# Altium PCB ResearchProject_V3_PCB.PcbDoc (part 2 of 2)
Units mil, origin at the board's own origin, x right, y up, seen from the top; angles counter-clockwise.
Board outline 6000 x 4000 mil, 4 copper layers (Top Layer, GND, 3V3, Bottom Layer), stack 23.756 mil thick; 138 components, 184 nets, 719 pads, 107 vias.
Unrouted connection lines stored in the file: 106.
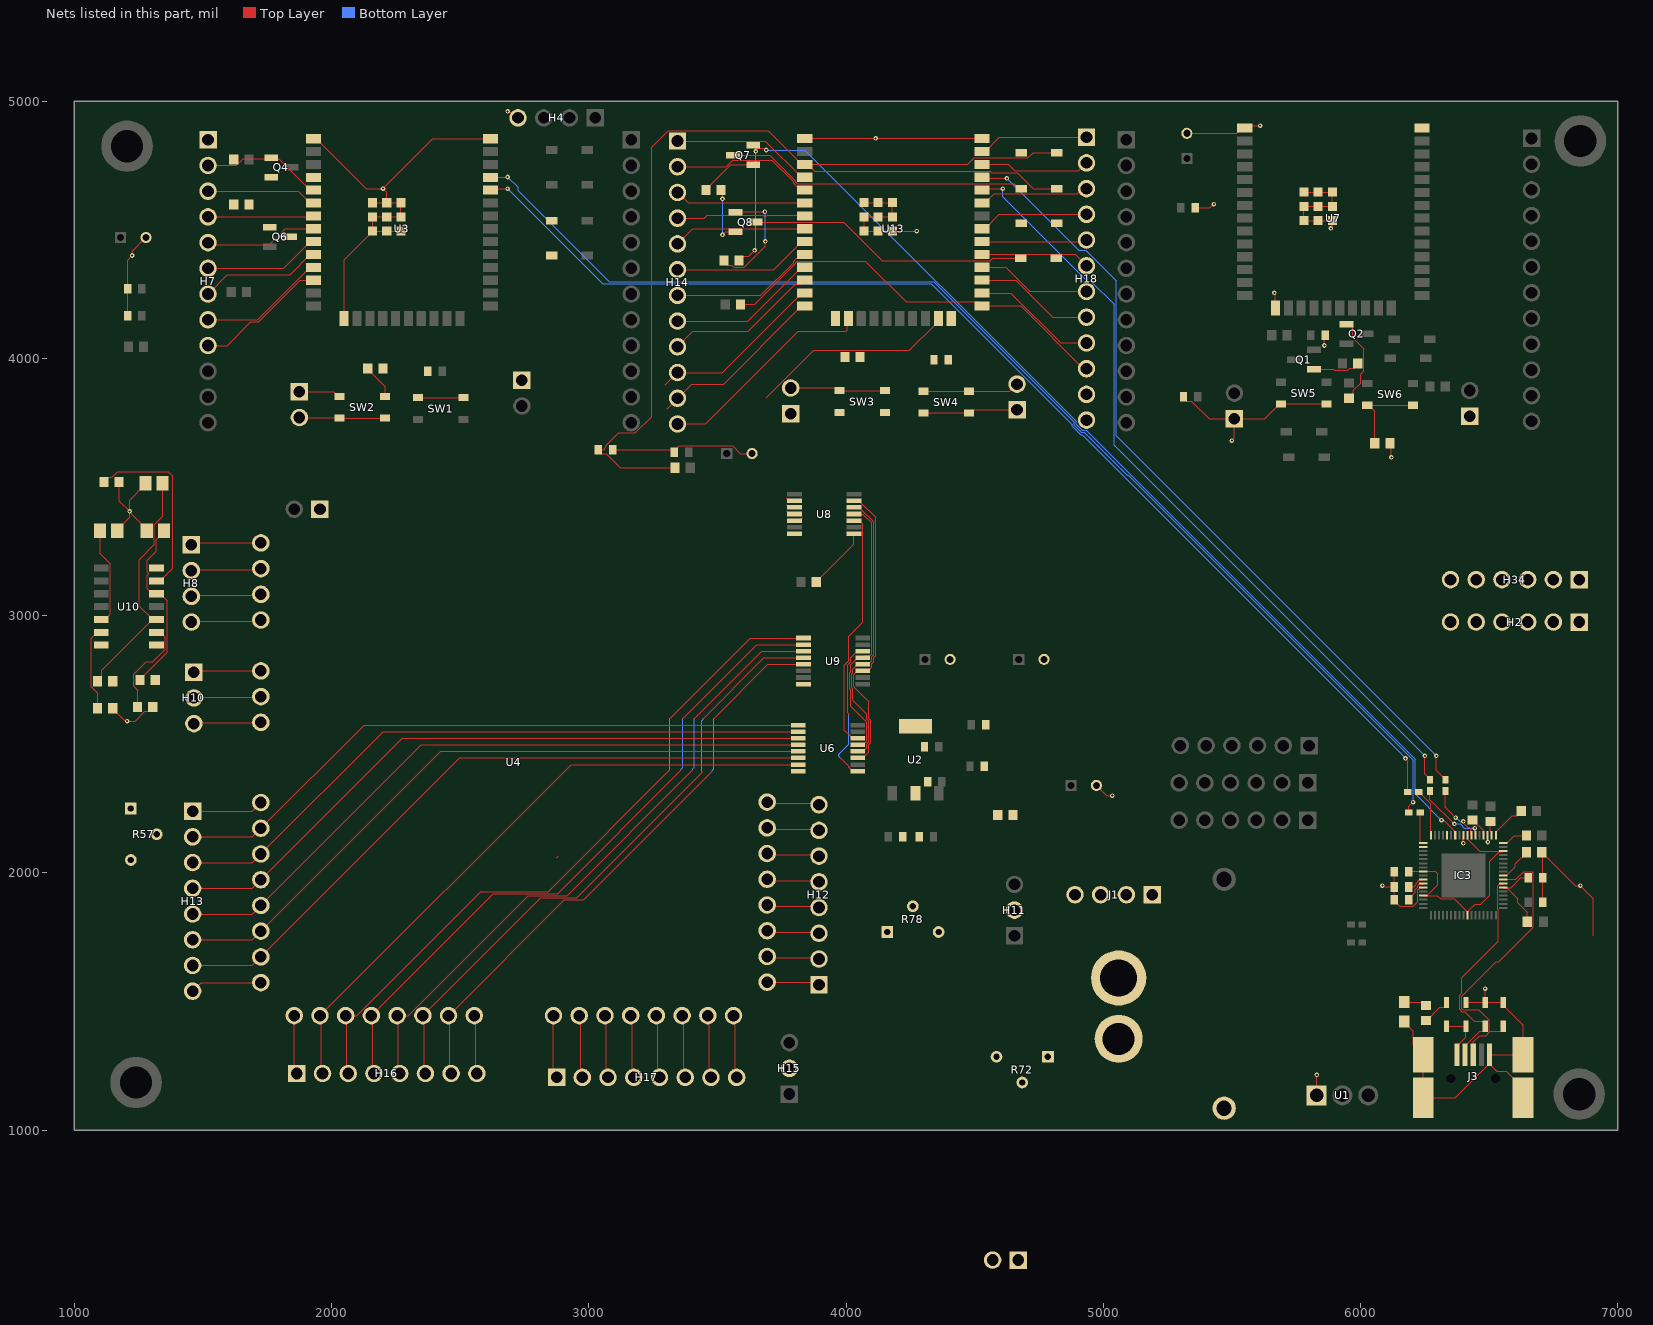
[diagram p4: the nets of this part, all layers, seen from the top]

## Via types
v1: diameter 17.72, hole 7.87, Top Layer to GND, 55 vias
v2: diameter 17.72, hole 7.87, GND to Bottom Layer, 34 vias
v3: diameter 17.72, hole 7.87, Top Layer to 3V3, 18 vias

## Nets (pads, with @x,y where several pads share a name; then routed paths per layer and width w, separated by ;. In a path a pad name is that pad's centre, name@x,y a point inside that pad or via, vN(x,y) a via of type N, cw(c..) or ccw(c..) an arc to the next point about the centre after c; other vN are vias at no path point) (continued)
CLIENT_GPIO25: H7.7 U3.10 | length 473.2
  Top Layer w4: H7.7@1520,4250 1595.17,4325.17 1838.98,4325.17 1917.64,4403.82 U3.10@1929.45,4403.82
CLIENT_GPIO26: H7.8 U3.11 | length 493.9
  Top Layer w4: H7.8@1520,4150 1713.82,4150 1917.64,4353.82 U3.11@1929.45,4353.82
CLIENT_GPIO27: H7.9 U3.12 | length 514.6
  Top Layer w4: H7.9@1520,4050 1594.59,4050 1686.59,4142 1717.13,4142 1878.95,4303.82 U3.12@1929.45,4303.82
CLIENT_GPIO32: H7.5 U3.8 | length 439
  Top Layer w4: H7.5@1520,4450 1528.8,4441.2 1758.43,4441.2 1821.04,4503.82 U3.8@1929.45,4503.82
CLIENT_GPIO33: H7.6 U3.9 | length 452.5
  Top Layer w4: H7.6@1520,4350 1813.82,4350 1917.64,4453.82 U3.9@1929.45,4453.82
CLIENT_GPIO34: H7.3 U3.6 | length 428.6
  Top Layer w4: H7.3@1520,4650 1871.46,4650 1917.64,4603.82 U3.6@1929.45,4603.82
CLIENT_GPIO35: H7.4 U3.7 | length 411
  Top Layer w4: H7.4@1520,4550 1925.63,4550 U3.7@1929.45,4553.82
CLIENT_GPIO36: H7.1 U3.4
CLIENT_GPIO39: H7.2 U3.5 | length 471.3
  Top Layer w4: H7.2@1520,4750 1629.57,4750 1656.16,4776.59 1794.87,4776.59 1917.64,4653.82 U3.5@1929.45,4653.82
CLIENT_IO0_AUTO: D17.1 Q6.3
CLIENT_IO0_KEY: D16.1 H20.2 SW2.3 SW2.4 | length 334.5
  Top Layer w4: H20.2@1875,3770 2029.09,3770 SW2.3@2031.42,3767.68 SW2.4@2208.58,3767.68
CLIENT_RTS: IC3.19 Q4.2 R51.1
CLIENT_RXD: IC3.18 R19.1 | length 130.7
  Top Layer w4: R19.1@6231.65,2235 6231.65,2117.92 6233.59,2115.98 IC3.18@6244.49,2115.98
CLIENT_TXD: IC3.17 R18.1 | length 190.8
  Top Layer w4: R18.1@6226.65,2315 6229.61,2315 6239.42,2305.19 6239.42,2302.24 6274.02,2267.64 IC3.17@6274.02,2145.51
CLIENT_U0RXD: R18.2 U3.34 | length 4614.3
  Top Layer w4: U3.34@2618.43,4653.82 2624.61,4660 v2(2685,4660) ; v2(6175,2445) 6175,2441.29 6183.35,2432.94 R18.2@6183.35,2315
  Bottom Layer w4: v2(2685,4660) 3055.04,4289.96 4331.55,4289.96 4879.04,3742.46 4879.04,3736.82 4911.82,3704.04 4917.46,3704.04 6175,2446.51 v2(6175,2445)
  other v1: 6175,2445 2685,4660
CLIENT_U0TXD: R19.2 U3.35 | length 4749.6
  Top Layer w4: U3.35@2618.43,4703.82 2619.61,4705 v1(2685,4705) ; R19.2@6188.35,2235 6188.35,2258.35 v1(6205,2275)
  Bottom Layer w4: v1(2685,4705) 2725.53,4664.47 2725.53,4652.05 3079.62,4297.96 4340.54,4297.96 4887.04,3751.45 4887.04,3740.14 4915.14,3712.04 4926.45,3712.04 5092.44,3546.05 5096.38,3546.05 6205,2437.43 v1(6205,2275)
  other v2: 6205,2275 2685,4705
GND: C1.2 C2.2 C3.2 C4.2 C5.2 C6.2 C7.2 C8.2 C9.2 C10.2 C11.2 C12.1 C16.2 C17.2 C25.2 C32.2 C35.1 C37.2 C38.2 C39.2 C43.2 C45.1 C46.2 C49.2 C50.2 C51.2 C52.2 C59.2 C60.2 D8.1 D9.1 D10.1 D13.1 H2.1 H2.2 H2.3 H2.4 H2.5 H2.6 H4.4 H6.1 H19.1 H21.1 H22.1 H34.1 H34.2 H34.3 H34.4 H34.5 H34.6 IC3.3 IC3.9 IC3.29 J1.3 J1.4 J2.2 J3.5 J3.6 J3.7 J3.8 J3.9 R5.2 R38.2 R50.2 R56.1 R65.2 R70.1 R77.1 SW1.1 SW1.2 SW3.1 SW3.2 SW5.1 SW5.2 U1.1 U2.2 U2.4 U3.1 U3.15 U3.38 U3.39 U3.40 U3.41 U3.42 U3.43 U3.44 U3.45 U3.46 U3.47 U4.1 U6.8 U7.1 U7.15 U7.38 U7.39 U7.40 U7.41 U7.42 U7.43 U7.44 U7.45 U7.46 U7.47 U8.7 U9.8 U13.1 U13.15 U13.38 U13.39 U13.40 U13.41 U13.42 U13.43 U13.44 U13.45 U13.46 U13.47 | length 9108.3
  Top Layer w4: R56.1@1149.53,2640 1149.53,2638.03 1194.93,2592.62 1202.38,2592.62 v1(1205,2590) 1236.83,2590 1274.15,2627.31 1289.28,2627.31 1305,2643.03 R70.1@1305,2645 ; C43.2@1166.93,3330 1166.93,3334.92 1215,3382.99 1215,3401.46 1281.54,3334.92 C49.2@1281.54,3330 ; R77.1@1174.53,3520 1174.53,3445.47 v1(1215,3405) 1215,3448.54 1276.54,3510.08 C46.2@1276.54,3515 ; C16.2@1207.05,4165 C9.2@1207.05,4270 1207.05,4382.05 v1(1225,4400) 1225,4416.57 C8.2@1278.43,4470 ; U3.1@1929.45,4853.82 1941.26,4853.82 2135.08,4660 v1(2200,4660) ; U3.15@2048.94,4154.61 2048.94,4383.94 U3.41@2159.76,4494.76 ; U3.39@2159.76,4605 U3.46@2214.88,4605 ; U3.43@2270,4494.76 U3.42@2214.88,4494.76 U3.41@2159.76,4494.76 ; SW1.1@2336.42,3847.32 SW1.2@2513.58,3847.32 ; U3.38@2618.43,4853.82 2393.82,4853.82 v1(2200,4660) ; v1(2685,4960) 2688.71,4960 2713.71,4935 H4.4@2725,4935 ; C52.2@3092.95,3645 3322.05,3645 3328.5,3638.54 3331.46,3638.54 3352.42,3659.5 3558.86,3659.5 3588.37,3630 C50.2@3635,3630 ; U13.1@3839.68,4854.06 3840.63,4855 v1(4115,4855) 4527.72,4855 U13.38@4528.66,4854.06 ; U13.39@4070,4605.24 U13.46@4125.12,4605.24 U13.45@4180.24,4605.24 U13.44@4180.24,4550.12 U13.47@4125.12,4550.12 U13.40@4070,4550.12 U13.41@4070,4495 U13.42@4125.12,4495 U13.43@4180.24,4495 v1(4275,4495) ; C17.2@4973.43,2340 5013.43,2300 v1(5035,2300) ; C12.1@5312.05,3850 5312.05,3845.87 5324.42,3833.5 5343.1,3833.5 5411.59,3765 H6.1@5510,3765 ; C1.2@5325,4875 5518.19,4875 5538.19,4895 U7.1@5550,4895 5560,4905 v1(5610,4905) ; C11.2@5357.95,4585 5415,4585 v1(5430,4600) ; v1(5500,3680) 5500,3681.01 5510,3691.01 H6.1@5510,3765 ; v1(5665,4255) 5665,4251.29 5669.49,4246.8 U7.15@5669.49,4195.79 ; U7.39@5764.6,4661.9 U7.39@5780.31,4646.18 U7.46@5835.43,4646.18 U7.45@5890.55,4646.18 U7.44@5890.55,4591.06 U7.47@5835.43,4591.06 U7.40@5780.31,4591.06 U7.41@5780.31,4535.94 U7.42@5835.43,4535.94 U7.43@5890.55,4535.94 5890.55,4513.68 5885,4508.13 v1(5885,4505) ; U1.1@5829.61,1135 5830,1135.39 v1(5830,1215) ; v1(5860,4050) 5860,4087.05 C10.2@5862.95,4090 ; SW5.1@5868.58,3822.68 SW5.2@5691.42,3822.68 5685.51,3822.68 5627.83,3765 H6.1@5510,3765 ; v1(6085,1950) 6088.71,1950 6093.71,1945 C59.2@6132.05,1945 ; R5.2@6114.53,3670 6120,3664.53 v1(6120,3615) ; C38.2@6132.05,2005 C59.2@6132.05,1945 ; D13.1@6170,1422.6 6170,1419.65 6206.13,1383.51 6206.13,1330.87 J3.6@6244.49,1292.52 J3.7@6244.49,1125.2 6368.5,1125.2 J3.5@6501.38,1258.07 ; IC3.29@6244.49,1942.76 6231.69,1942.76 6225.88,1936.94 6225.27,1936.94 6221.76,1933.43 6221.76,1887.44 6204.81,1870.5 6152.42,1870.5 6132.05,1890.87 C60.2@6132.05,1895 C59.2@6132.05,1945 ; v1(6400,2115) IC3.9@6400,2145.51 ; D10.1@6410,1496.26 D9.1@6485,1496.26 ; v1(6485,1550) D9.1@6485,1496.26 ; IC3.3@6494.49,2145.51 6494.74,2145.26 6494.74,2120.26 v1(6495,2120) ; J3.9@6632.28,1125.2 6632.28,1163.58 6566.31,1229.56 6529.89,1229.56 J3.5@6501.38,1258.07 ; R38.2@6704.53,2078.03 6720.24,2062.31 6722.21,2062.31 6834.53,1950 v1(6855,1950) 6905,1900 6905,1755 ; R38.2@6704.53,2080 6707.95,2076.57 C25.2@6707.95,1980 C39.2@6707.95,1885 ; U3.41@2159.76,4494.76 U3.40@2159.76,4549.88 U3.47@2214.88,4549.88 U3.44@2270,4549.88 U3.45@2270,4605 U3.46@2214.88,4605 ; v1(2200,4660) 2214.88,4645.12 U3.46@2214.88,4605 ; D9.1@6485,1496.26 D8.1@6555,1496.26 6555,1484.45 6632.28,1407.17 J3.8@6632.28,1292.52 J3.5@6501.38,1292.52 J3.5@6501.38,1258.07
NetC25_1: C25.1 FB2.2 IC3.57 | length 291.1
  Top Layer w4: FB2.2@6648.5,1810 6648.5,1847.18 6611.62,1884.07 6611.62,1900.06 6570.86,1940.82 6557.45,1940.82 IC3.57@6555.51,1942.76 6585.37,1942.76 6622.61,1980 C25.1@6652.05,1980
NetC43_1: C43.1 R54.2 U10.5 | length 384.7
  Top Layer w4: C43.1@1100,3330 1100,3241.04 1139.78,3201.26 1139.78,3004.78 1120,2985 U10.5@1105,2985
NetC46_1: C46.1 R68.2 U10.10 | length 933.2
  Top Layer w4: R68.2@1090.47,2745 1106.19,2760.72 1106.19,2787.09 U10.10@1304.09,2985 ; U10.10@1319.09,2985 U10.10@1304.09,2985 ; C46.1@1343.46,3515 1343.46,3385.65 1311.16,3353.34 1311.16,3276.44 1251.76,3217.04 1251.76,3037.34 U10.10@1304.09,2985
NetC49_1: C49.1 R75.2 U10.12 | length 705.3
  Top Layer w4: R75.2@1255.47,2750 1255.47,2751.97 1361.87,2858.37 1361.87,3057.22 1334.09,3085 U10.12@1319.09,3085 1304.09,3085 1284.31,3104.78 1284.31,3156 1290.31,3162 1284.31,3168 1284.31,3214.83 1319.16,3249.67 1319.16,3295.77 1348.46,3325.08 C49.1@1348.46,3330
NetC59_1: C59.1 IC3.27 | length 72.5
  Top Layer w4: C59.1@6187.95,1945 6208.32,1945 6213.76,1950.43 6213.76,1952.49 6216.8,1955.53 6216.8,1959.97 6229.14,1972.32 6242.55,1972.32 IC3.27@6244.49,1974.25
NetC60_1: C60.1 IC3.28 | length 94.8
  Top Layer w4: C60.1@6187.95,1895 6187.95,1899.13 6213.76,1924.94 6213.76,1936.74 6221.76,1944.74 6221.76,1949.18 6229.14,1956.57 6242.55,1956.57 IC3.28@6244.49,1958.5
NetD6_2: D6.2 D10.2 J3.1 | length 200.6
  Top Layer w4: D6.2@6335,1403.74 D10.2@6410,1403.74 6410,1361.57 6375.39,1326.97 J3.1@6375.39,1292.52
NetD13_2: D13.2 R44.1 | length 90.3
  Top Layer w4: D13.2@6170,1497.4 6242.13,1497.4 R44.1@6255,1484.53
NetF1_1: F1.1 J1.1 J1.2 J2.1
NetH20_1: H20.1 R50.1 SW2.1 SW2.2 | length 299.4
  Top Layer w4: H20.1@1875,3870 2007.83,3870 2025.51,3852.32 SW2.1@2031.42,3852.32 ; R50.1@2140.94,3960 2140.94,3958.03 2208.58,3890.39 SW2.2@2208.58,3852.32
NetH21_2: H21.2 R48.1 U8.8 | length 248.8
  Top Layer w4: R48.1@3884.53,3130 3884.53,3131.97 4030.67,3278.11 U8.8@4030.67,3318.23
NetH23_1: H23.1 R65.1 SW4.1 SW4.2 | length 368.7
  Top Layer w4: SW4.2@4301.42,3787.68 SW4.1@4478.58,3787.68 4484.49,3787.68 4496.81,3800 H23.1@4665,3800
NetH24_1: H24.1 R5.1 SW6.1 SW6.2 | length 340.3
  Top Layer w4: R5.1@6055.47,3670 6055.47,3794.53 6032.32,3817.68 SW6.2@6026.42,3817.68 SW6.1@6203.58,3817.68
NetIC3_1: IC3.1 R42.2 | length 146.8
  Top Layer w4: IC3.1@6525.98,2145.51 6525.98,2158.31 6589.99,2222.31 6609.28,2222.31 6625,2238.03 R42.2@6625,2240
NetIC3_2: IC3.2 R40.2 | length 56.7
  Top Layer w4: R40.2@6505,2200 6505,2163.54 6510.24,2158.31 IC3.2@6510.24,2145.51
NetIC3_4: IC3.4 R33.1 | length 78.8
  Top Layer w4: R33.1@6435,2205 6436.97,2205 6476.8,2165.17 6476.8,2147.45 IC3.4@6478.74,2145.51
NetIC3_60: IC3.60 R38.1 | length 135.1
  Top Layer w4: IC3.60@6555.51,1990 6557.45,1991.94 6570.86,1991.94 6602.24,2023.32 6602.24,2034.8 6645.47,2078.03 R38.1@6645.47,2080
NetIC3_68: IC3.68 R45.1 | length 102
  Top Layer w4: IC3.68@6555.51,2115.98 6568.31,2115.98 6597.32,2145 R45.1@6645.47,2145
NetQ1_1: Q1.1 R2.2 | length 183.1
  Top Layer w4: Q1.1@5819.37,3957.2 5895.86,3957.2 5898.75,3954.31 5950.67,3954.31 5958.67,3962.31 5973.81,3962.31 5989.53,3978.03 R2.2@5989.53,3980
NetQ2_1: Q2.1 R3.2 | length 335.1
  Top Layer w4: R3.2@5955,3845 5956.97,3845 5972.69,3860.72 5972.69,3875.85 6000.73,3903.9 6000.73,3939.21 6013.24,3951.72 6013.24,4037.45 5970.2,4080.49 5970.2,4122 5962.26,4129.95 Q2.1@5958.51,4129.95
NetQ4_1: Q4.1 R47.2
NetQ6_1: Q6.1 R51.2
NetQ7_1: Q7.1 R59.2 | length 225.3
  Top Layer w4: R59.2@3455.47,4655 3455.47,4656.97 3471.19,4672.69 3473.16,4672.69 3552.68,4752.2 Q7.1@3639.37,4752.2
NetQ8_1: Q8.1 R69.2 | length 456.6
  Top Layer w4: R69.2@3525.47,4380 3525.47,4378.03 3541.19,4362.31 3556.33,4362.31 3564.33,4354.31 3604.73,4354.31 3686.57,4436.16 v1(3686.57,4455.2) ; Q8.1@3570.63,4567.8 3572.83,4570 v1(3685,4570)
  Bottom Layer w4: v1(3685,4570) 3685.79,4569.21 3685.79,4455.98 v1(3686.57,4455.2)
  other v2: 3686.57,4455.2 3685,4570
NetR56_2: R56.2 R57.1 U10.6 | length 329.5
  Top Layer w4: R56.2@1090.47,2640 1090.47,2699.11 1066.76,2722.83 1066.76,2911.76 1090,2935 U10.6@1105,2935
NetR70_2: R70.2 R72.1 U10.9 | length 384.6
  Top Layer w4: R70.2@1245.94,2645 1245.94,2710.33 1231.76,2724.52 1231.76,2772.17 1280.04,2820.45 1305.59,2820.45 1353.87,2868.74 1353.87,2915.22 1334.09,2935 U10.9@1319.09,2935
NetR77_2: R77.2 R78.1 U10.13 | length 734.1
  Top Layer w4: R77.2@1115.47,3520 1115.47,3521.97 1131.19,3537.69 1146.33,3537.69 1168.18,3559.54 1364.57,3559.54 1383.09,3541.03 1383.09,3183.99 1334.09,3135 U10.13@1319.09,3135
NetU6_9: U6.9 U9.14 | length 562
  Top Layer w4: 3975,2450 4010.61,2414.39 4010.61,2409.68 4018,2402.29 4038.3,2402.29 U6.9@4045.16,2395.43 ; 4010,2615 4010,2618.71 4006.77,2621.94 4006.77,2809.25 4018.61,2821.09 4018.61,2835.37 4034.29,2851.04 4034.9,2851.04 4045.63,2861.77 U9.14@4065.32,2861.77
  Bottom Layer w4: 3975,2450 3972.38,2452.62 3972.38,2457.62 3971.66,2458.34 3971.66,2461.66 4010,2500 4010,2615
PLC_A_1: H8.2 R57.2 R57.3 U4.4 U10.7 | length 273.3
  Top Layer w4: H8.2@1455,3175 1458.9,3178.9 1721.18,3178.9 U4.4@1725.08,3182.8
PLC_A_2: H8.3 R72.2 R72.3 U4.5 U10.8 | length 273.3
  Top Layer w4: H8.3@1455,3075 1458.9,3078.9 1721.18,3078.9 U4.5@1725.08,3082.8
PLC_A_3: H8.4 R78.2 R78.3 U4.6 U10.14 | length 273.3
  Top Layer w4: H8.4@1455,2975 1458.9,2978.9 1721.18,2978.9 U4.6@1725.08,2982.8
PLC_A_GND: H8.1 U4.3 | length 273.3
  Top Layer w4: H8.1@1455,3275 1462.8,3282.8 U4.3@1725.08,3282.8
PLC_A_RS_GND: H10.3 U4.9 | length 262.2
  Top Layer w4: H10.3@1465,2580 1467.58,2582.58 1722.5,2582.58 U4.9@1725.08,2585.16
PLC_A_RS_RX: H10.1 U4.7 | length 262.2
  Top Layer w4: H10.1@1465,2780 1470.16,2785.16 U4.7@1725.08,2785.16
PLC_A_RS_TX: H10.2 U4.8 | length 262.2
  Top Layer w4: H10.2@1465,2680 1467.58,2682.58 1722.5,2682.58 U4.8@1725.08,2685.16
PLC_B_1: H13.2 U4.11 U6.1 | length 2534.8
  Top Layer w4: H13.2@1460,2140 1691.73,2140 U4.11@1725.08,2173.35 2126.3,2574.57 U6.1@3814.84,2574.57
PLC_B_2: H13.3 U4.12 U6.2 | length 2565.7
  Top Layer w4: H13.3@1460,2040 1691.73,2040 U4.12@1725.08,2073.35 2200.71,2548.98 U6.2@3814.84,2548.98
PLC_B_3: H13.4 U4.13 U6.3 | length 2596.5
  Top Layer w4: H13.4@1460,1940 1691.73,1940 U4.13@1725.08,1973.35 2275.12,2523.39 U6.3@3814.84,2523.39
PLC_B_4: H13.5 U4.14 U6.4 | length 2627.3
  Top Layer w4: H13.5@1460,1840 1691.73,1840 U4.14@1725.08,1873.35 2349.53,2497.8 U6.4@3814.84,2497.8
PLC_B_5: H13.6 U4.15 U6.5 | length 2658.1
  Top Layer w4: H13.6@1460,1740 1691.73,1740 U4.15@1725.08,1773.35 2423.94,2472.2 U6.5@3814.84,2472.2
PLC_B_6: H13.7 U4.16 U6.6 | length 2689
  Top Layer w4: H13.7@1460,1640 1691.73,1640 U4.16@1725.08,1673.35 2498.35,2446.61 U6.6@3814.84,2446.61
PLC_B_GND: H13.1 U4.10 | length 278.9
  Top Layer w4: H13.1@1460,2240 1691.73,2240 U4.10@1725.08,2273.35
PLC_B_VI: H13.8 U4.17 | length 278.9
  Top Layer w4: H13.8@1460,1540 1493.35,1573.35 U4.17@1725.08,1573.35
PLC_C_1: H16.2 U4.19 U6.7 | length 2493.3
  Top Layer w4: H16.2@1965,1220 1960,1225 1960,1440 U4.19@1955,1445 2931.02,2421.02 U6.7@3814.84,2421.02
PLC_C_2: H16.3 U4.20 U9.1 | length 2734.3
  Top Layer w4: H16.3@2065,1220 2060,1225 2060,1440 U4.20@2055,1445 2098.49,1445 2580.8,1927.3 2842.3,1927.3 3315,2400 ; 3315,2600 3627.95,2912.95 U9.1@3835,2912.95
  Bottom Layer w4: 3315,2400 3315,2600
PLC_C_3: H16.4 U4.21 U9.2 | length 2620.8
  Top Layer w4: H16.4@2165,1220 2160,1225 2160,1440 U4.21@2155,1445 2629.3,1919.3 2879.3,1919.3 3360,2400 ; 3365,2600 3652.36,2887.36 U9.2@3835,2887.36
  Bottom Layer w4: 3360,2400 3360,2403.71 3365,2408.71 3365,2600
PLC_C_4: H16.5 U4.22 U9.3 | length 2510.2
  Top Layer w4: H16.5@2265,1220 2260,1225 2260,1440 U4.22@2255,1445 2298.49,1445 2764.8,1911.3 2916.3,1911.3 3405,2400 ; 3410,2600 3671.77,2861.77 U9.3@3835,2861.77
  Bottom Layer w4: 3405,2400 3405,2403.71 3410,2408.71 3410,2600
PLC_C_5: H16.6 U4.23 U9.4 | length 2406.2
  Top Layer w4: H16.6@2365,1220 2360,1225 2360,1440 U4.23@2355,1445 2813.3,1903.3 2953.3,1903.3 3440.84,2390.84 3440.84,2394.16 3440,2395 ; 3445,2600 3681.18,2836.18 U9.4@3835,2836.18
  Bottom Layer w4: 3440,2395 3440,2591.29 3445,2596.29 3445,2600
PLC_C_6: H16.7 U4.24 U9.5 | length 2291.9
  Top Layer w4: H16.7@2465,1220 2460,1225 2460,1440 U4.24@2455,1445 2905.3,1895.3 2980.3,1895.3 3480,2395 ; 3485,2600 3695.59,2810.59 U9.5@3835,2810.59
  Bottom Layer w4: 3480,2395 3480,2398.71 3485,2403.71 3485,2600
PLC_C_GND: H16.1 U4.18 | length 229.1
  Top Layer w4: U4.18@1855,1445 1855,1230 H16.1@1865,1220
PLC_C_VI2: H16.8 U4.25 | length 229.1
  Top Layer w4: U4.25@2555,1445 2560,1440 2560,1225 H16.8@2565,1220
PLC_D_1: H17.2 U4.27 | length 245
  Top Layer w4: U4.27@2962.87,1445 2968.94,1438.94 2968.94,1211.06 H17.2@2975,1205
PLC_D_2: H17.3 U4.28 | length 245
  Top Layer w4: U4.28@3062.87,1445 3068.94,1438.94 3068.94,1211.06 H17.3@3075,1205
PLC_D_3: H17.4 U4.29 | length 245
  Top Layer w4: U4.29@3162.87,1445 3168.94,1438.94 3168.94,1211.06 H17.4@3175,1205
PLC_D_4: H17.5 U4.30 | length 245
  Top Layer w4: U4.30@3262.87,1445 3268.94,1438.94 3268.94,1211.06 H17.5@3275,1205
PLC_D_5: H17.6 U4.31 | length 245
  Top Layer w4: U4.31@3362.87,1445 3368.94,1438.94 3368.94,1211.06 H17.6@3375,1205
PLC_D_6: H17.7 U4.32 | length 245
  Top Layer w4: U4.32@3462.87,1445 3468.94,1438.94 3468.94,1211.06 H17.7@3475,1205
PLC_D_GND: H17.1 U4.26 | length 245
  Top Layer w4: U4.26@2862.87,1445 2862.87,1217.13 H17.1@2875,1205
PLC_D_VO1: H15.2 H17.8 U4.33 | length 245
  Top Layer w4: U4.33@3562.87,1445 3568.94,1438.94 3568.94,1211.06 H17.8@3575,1205
PLC_DS: U6.14 U8.10 | length 945.1
  Top Layer w4: 2875.16,2058.39 2882.02,2065.24 ; U8.10@4030.67,3369.41 4050.85,3369.41 4061.58,3358.68 4062.19,3358.68 4065.7,3355.16 4065.7,2973.94 4010.61,2918.85 4010.61,2824.4 3994.14,2807.93 3994.14,2554.11 4018,2530.24 4038.3,2530.24 U6.14@4045.16,2523.39
PLC_E_1: H12.2 U4.35 | length 205.5
  Top Layer w4: U4.35@3693.58,1674.92 3698.54,1669.96 3890.04,1669.96 H12.2@3895,1665
PLC_E_2: H12.3 U4.36 | length 205.5
  Top Layer w4: U4.36@3693.58,1774.92 3698.54,1769.96 3890.04,1769.96 H12.3@3895,1765
PLC_E_3: H12.4 U4.37 | length 205.5
  Top Layer w4: U4.37@3693.58,1874.92 3698.54,1869.96 3890.04,1869.96 H12.4@3895,1865
PLC_E_4: H12.5 U4.38 | length 205.5
  Top Layer w4: U4.38@3693.58,1974.92 3698.54,1969.96 3890.04,1969.96 H12.5@3895,1965
PLC_E_5: H12.6 U4.39 | length 205.5
  Top Layer w4: U4.39@3693.58,2074.92 3698.54,2069.96 3890.04,2069.96 H12.6@3895,2065
PLC_E_6: H12.7 U4.40 | length 205.5
  Top Layer w4: U4.40@3693.58,2174.92 3698.54,2169.96 3890.04,2169.96 H12.7@3895,2165
PLC_E_GND: H12.1 U4.34 | length 205.5
  Top Layer w4: U4.34@3693.58,1574.92 3885.08,1574.92 H12.1@3895,1565
PLC_E_VO2: H11.2 H12.8 U4.41 | length 205.5
  Top Layer w4: U4.41@3693.58,2274.92 3698.54,2269.96 3890.04,2269.96 H12.8@3895,2265
PLC_OE: U6.13 U8.11 U9.13 | length 1058.5
  Top Layer w4: U8.11@4030.67,3395 4065.7,3395 4099.86,3360.85 4099.86,2850.43 4092.47,2843.04 4072.17,2843.04 U9.13@4065.32,2836.18 4045.63,2836.18 4034.9,2825.45 4034.29,2825.45 4018.61,2809.78 4018.61,2781.22 4014.77,2777.38 4014.77,2715.85 4018.61,2712.01 4018.61,2647 4079.7,2585.91 4079.7,2512.04 4072.31,2504.65 4052.02,2504.65 U6.13@4045.16,2497.8
PLC_SH_CP: U6.11 U8.13 U9.11 | length 1165.8
  Top Layer w4: U8.13@4030.67,3446.18 4050.85,3446.18 4061.58,3435.45 4062.19,3435.45 4115.86,3381.78 4115.86,2843.8 4107.86,2835.8 4107.86,2821.52 4099.86,2813.52 4099.86,2799.25 4092.47,2791.86 4072.17,2791.86 U9.11@4065.32,2785 4045.63,2785 4034.9,2774.27 4034.29,2774.27 4030.77,2770.75 4030.77,2722.48 4087.7,2665.55 4087.7,2600.54 4095.7,2592.54 4095.7,2505.41 4087.7,2497.41 4087.7,2468.86 4072.31,2453.47 4052.02,2453.47 U6.11@4045.16,2446.61
PLC_ST_CP: U6.12 U8.12 U9.12 | length 1108
  Top Layer w4: U8.12@4030.67,3420.59 4050.85,3420.59 4061.58,3409.86 4062.19,3409.86 4107.86,3364.19 4107.86,2847.11 4099.86,2839.11 4099.86,2824.84 4092.47,2817.45 4072.17,2817.45 U9.12@4065.32,2810.59 4045.63,2810.59 4034.9,2799.86 4034.29,2799.86 4026.61,2792.19 4026.61,2777.91 4022.77,2774.07 4022.77,2719.16 4026.61,2715.32 4026.61,2670.02 4079.7,2616.93 4079.7,2597.22 4087.7,2589.22 4087.7,2508.73 4079.7,2500.73 4079.7,2486.45 4072.31,2479.06 4052.02,2479.06 U6.12@4045.16,2472.2
SERVER_DTR: IC3.13 Q8.2 R59.1 | length 233
  Top Layer w4: R59.1@3514.53,4655 3520,4649.53 v2(3520,4620) ; v2(3520,4480) 3532.2,4492.2 Q8.2@3570.63,4492.2
  Bottom Layer w4: v2(3520,4480) v2(3520,4620)
  other v1: 3520,4480 3520,4620
SERVER_EN: C52.1 D18.2 D19.2 R102.2 U13.3 | length 4310.4
  Top Layer w4: R102.2@3335.47,3575 3121.59,3575 3068.1,3628.5 3049.42,3628.5 3037.05,3640.87 C52.1@3037.05,3645 3057.42,3645 3066.76,3654.34 3066.76,3660.16 3116.64,3710.04 3181.55,3710.04 3245.05,3773.55 3245.05,4821.45 3308.56,4884.96 3696.97,4884.96 3827.87,4754.06 U13.3@3839.68,4754.06 ; D19.2@4818.9,4660 4726.99,4660 4665.75,4721.24 4567.21,4721.24 4560.67,4727.77 3877.78,4727.77 3851.5,4754.06 4472.93,4754.06 4498.11,4779.24 4706.23,4779.24 4726.99,4800 D18.2@4818.9,4800
SERVER_EN_AUTO: D19.1 Q7.3 | length 1178.1
  Top Layer w4: Q7.3@3560.63,4790 3642.57,4790 3643.43,4789.14 3656.57,4789.14 3657.43,4790 3703.24,4790 3804.16,4689.09 3804.16,4683.85 3809.59,4678.42 4654.81,4678.42 4673.23,4660 D19.1@4681.1,4660
SERVER_EN_KEY: C45.2 D18.1 H22.2 SW3.3 SW3.4 | length 371.5
  Top Layer w4: H22.2@3785,3885 3964.65,3885 SW3.4@3975,3874.65 SW3.3@4152.17,3874.65
SERVER_GPIO0: D20.2 D21.2 H18.10 R64.1 U13.25 | length 1591.1
  Top Layer w4: R64.1@3589.53,4210 3645.13,4210 3804.16,4369.02 3804.16,4374.26 3807.67,4377.77 4075.4,4377.77 4233.4,4219.77 4512.94,4219.77 U13.25@4528.66,4204.06 4678.61,4204.06 4922.66,3960 H18.10@4935,3960
SERVER_GPIO2: H18.11 U13.24
SERVER_GPIO4: H18.9 U13.26 | length 486.7
  Top Layer w4: U13.26@4528.66,4254.06 4639.92,4254.06 4833.97,4060 H18.9@4935,4060
SERVER_GPIO5: H18.6 U13.29 | length 424.6
  Top Layer w4: U13.29@4528.66,4404.06 4890.94,4404.06 H18.6@4935,4360
SERVER_GPIO12: H14.11 U8.3 U13.14 | length 736.6
  Top Layer w4: 3305.04,3805.04 H14.11@3345,3845 3400,3900 3525,3900 3668.58,4043.58 3668.58,4044.76 3827.87,4204.06 U13.14@3839.68,4204.06 ; 3767.81,3431.32 3768.42,3431.32 3779.15,3420.59 U8.3@3799.33,3420.59
SERVER_GPIO13: H14.12 U8.2 U13.16 | length 893.7
  Top Layer w4: H14.12@3345,3745 3455,3745 3815,4105 4000,4105 4005,4110 4005,4150.67 U13.16@4009.17,4154.84 ; 3767.81,3456.91 3768.42,3456.91 3779.15,3446.18 U8.2@3799.33,3446.18
SERVER_GPIO14: H14.10 U8.4 U13.13 | length 726.5
  Top Layer w4: 3297.04,3897.04 H14.10@3345,3945 3518.82,3945 3827.87,4254.06 U13.13@3839.68,4254.06 ; 3767.81,3405.73 3768.42,3405.73 3779.15,3395 U8.4@3799.33,3395
SERVER_GPIO15: H18.12 U8.5 U13.23 | length 827.3
  Top Layer w4: 3690.5,3847.01 3874.18,4030.69 4246.83,4030.69 4347.64,4131.5 U13.23@4363.97,4131.5 ; U8.5@3799.33,3369.41 3819.51,3369.41 3830.24,3380.14 3830.85,3380.14
SERVER_GPIO16: H18.8 R54.1 U13.27 | length 466
  Top Layer w4: U13.27@4528.66,4304.06 4659.85,4304.06 4803.9,4160 H18.8@4935,4160
SERVER_GPIO17: H18.7 U13.28 | length 445.3
  Top Layer w4: U13.28@4528.66,4354.06 4621.16,4354.06 4715.22,4260 H18.7@4935,4260
SERVER_GPIO18: H18.5 U13.30 | length 408.8
  Top Layer w4: U13.30@4528.66,4454.06 4528.84,4454.24 4929.24,4454.24 H18.5@4935,4460
SERVER_GPIO19: H18.4 U13.31 | length 429.5
  Top Layer w4: U13.31@4528.66,4504.06 4540.47,4504.06 4596.42,4560 H18.4@4935,4560
SERVER_GPIO21: H18.3 U13.33 | length 429.5
  Top Layer w4: U13.33@4528.66,4604.06 4540.47,4604.06 4575.65,4639.24 4899.26,4639.24 4920.02,4660 H18.3@4935,4660
SERVER_GPIO22: H18.2 U13.36 | length 429.4
  Top Layer w4: U13.36@4528.66,4754.06 4631.16,4754.06 4655.98,4729.24 4904.24,4729.24 H18.2@4935,4760
SERVER_GPIO23: H18.1 U13.37 | length 429.5
  Top Layer w4: U13.37@4528.66,4804.06 4540.47,4804.06 4596.42,4860 H18.1@4935,4860
SERVER_GPIO25: H14.7 U13.10 | length 563.6
  Top Layer w4: H14.7@3345,4245 3668.82,4245 3796.16,4372.34 3796.16,4377.57 3806.93,4388.34 3823.97,4388.34 U13.10@3839.68,4404.06
SERVER_GPIO26: H14.8 U13.11 | length 581.3
  Top Layer w4: H14.8@3345,4145 3618.82,4145 3827.87,4354.06 U13.11@3839.68,4354.06
SERVER_GPIO27: H14.9 U13.12 | length 602
  Top Layer w4: H14.9@3345,4045 3405,4105 3620,4105 3803.34,4288.34 3823.97,4288.34 U13.12@3839.68,4304.06
SERVER_GPIO32: H14.5 R75.1 U13.8 | length 519.1
  Top Layer w4: H14.5@3345,4445 3404.06,4504.06 U13.8@3839.68,4504.06
SERVER_GPIO33: H14.6 R68.1 U13.9 | length 539.9
  Top Layer w4: H14.6@3345,4345 3718.82,4345 3827.87,4454.06 U13.9@3839.68,4454.06
SERVER_GPIO34: H14.3 U13.6 | length 511.6
  Top Layer w4: H14.3@3345,4645 3385.94,4604.06 U13.6@3839.68,4604.06
SERVER_GPIO35: H14.4 U13.7 | length 501.1
  Top Layer w4: H14.4@3345,4545 3449.11,4545 3459.8,4555.69 3676.89,4555.69 3678.43,4554.14 3691.57,4554.14 3693.11,4555.69 3838.05,4555.69 U13.7@3839.68,4554.06
SERVER_GPIO36: H14.1 U13.4 | length 553.1
  Top Layer w4: H14.1@3345,4845 3686.93,4845 3827.87,4704.06 U13.4@3839.68,4704.06
SERVER_GPIO39: H14.2 U13.5 | length 557
  Top Layer w4: H14.2@3345,4745 3534.16,4745 3560.16,4771 3710.93,4771 3796.16,4685.77 3796.16,4680.54 3806.93,4669.77 3812.16,4669.77 3827.87,4654.06 U13.5@3839.68,4654.06
SERVER_IO0_AUTO: D21.1 Q8.3 | length 1096.6
  Top Layer w4: Q8.3@3649.37,4530 3991.08,4530 4140.74,4380.34 4560.67,4380.34 4570.34,4390 D21.1@4680,4390
SERVER_IO0_KEY: D20.1 H23.2 SW4.3 SW4.4 | length 375
  Top Layer w4: SW4.4@4301.42,3872.32 SW4.3@4478.58,3872.32 4636.17,3872.32 4663.85,3900 H23.2@4665,3900
SERVER_RTS: IC3.11 Q7.2 R69.1 | length 4425.5
  Top Layer w4: R69.1@3584.53,4380 3584.53,4381.97 3600.24,4397.69 3622.69,4397.69 v1(3645,4420) ; v1(3650,4805) 3650,4817.17 Q7.2@3639.37,4827.8 3650.17,4817 3679.29,4817 3686.29,4810 v2(3690,4810) ; v1(6315,2205) 6317.62,2202.38 6325.05,2202.38 6362.69,2164.73 6362.69,2164.12 6368.5,2158.31 IC3.11@6368.5,2145.51
  Bottom Layer w4: v1(3645,4420) 3645,4423.71 3650,4428.71 v1(3650,4805) ; v2(3690,4810) 3839.81,4810 4895.04,3754.76 4895.04,3743.45 4918.45,3720.04 4933.7,3720.04 6213,2440.74 6213,2307 v1(6315,2205)
  other v1: 3690,4810
  other v2: 6315,2205 3645,4420 3650,4805
SERVER_RXD: IC3.7 R106.1 | length 227
  Top Layer w4: R106.1@6330,2318.35 6330,2255 v1(6370,2215) ; v2(6400.11,2200) 6402.73,2197.38 6402.73,2191.38 6417.59,2176.52 6423.22,2176.52 6429.14,2170.6 6429.14,2166.86 6429.56,2166.44 6429.56,2147.45 IC3.7@6431.5,2145.51
  Bottom Layer w4: v1(6370,2215) 6385,2200 v2(6400.11,2200)
  other v1: 6400.11,2200
  other v2: 6370,2215
SERVER_TXD: IC3.6 R105.1 | length 283.4
  Top Layer w4: R105.1@6270,2318.35 6270,2285 v1(6365,2190) ; v2(6445,2173.43) 6446.12,2172.3 6446.12,2146.63 IC3.6@6447.24,2145.51
  Bottom Layer w4: v1(6365,2190) 6387.68,2190 6404.26,2173.43 v2(6445,2173.43)
  other v1: 6445,2173.43
  other v2: 6365,2190
SERVER_U0RXD: R105.2 U13.34 | length 3077.4
  Top Layer w4: U13.34@4528.66,4654.06 4534.61,4660 v2(4610,4660) ; v1(6250,2455) 6250,2384.61 6270,2364.61 R105.2@6270,2361.65
  Bottom Layer w4: v2(4610,4660) 4610,4628.49 4938.54,4299.96 4951.55,4299.96 5042.04,4209.46 5042.04,3662.96 v1(6250,2455)
  other v1: 4610,4660
  other v2: 6250,2455
SERVER_U0TXD: R106.2 U13.35 | length 3158.1
  Top Layer w4: U13.35@4528.66,4704.06 4532.72,4700 v1(4625,4700) ; v2(6295,2455) 6295,2399.61 6330,2364.61 R106.2@6330,2361.65
  Bottom Layer w4: v1(4625,4700) 4904.96,4420.04 4931.46,4420.04 5050.04,4301.46 5050.04,3699.96 v2(6295,2455)
  other v1: 6295,2455
  other v2: 4625,4700
USB_N: D9.2 IC3.58 J3.2 | length 854.3
  Top Layer w4: J3.2@6406.89,1292.52 6406.89,1326.97 6464.01,1384.09 6477.16,1384.09 6485,1391.93 D9.2@6485,1403.74 6485,1415.55 6477.16,1423.39 6442.88,1423.39 6405.67,1460.61 6394.36,1460.61 6386.16,1468.81 6386.16,1523.71 6394.16,1531.71 6394.16,1592.4 6535.92,1734.17 6535.92,1853.71 6532.78,1856.85 6532.78,1949.18 6540.17,1956.57 6553.57,1956.57 IC3.58@6555.51,1958.5
USB_P: D8.2 IC3.59 J3.3 | length 1153.6
  Top Layer w4: J3.3@6438.39,1292.52 6438.39,1342.81 6463.02,1367.45 6488.69,1367.45 6500.84,1379.6 ; D8.2@6555,1403.74 6555,1391.93 6547.16,1384.09 6505.33,1384.09 6500.84,1379.6 ; IC3.59@6555.51,1974.25 6604.45,1974.25 6634.7,2004.5 6668.9,2004.5 6672.42,2000.99 6672.42,1788.03 6538.51,1654.11 6527.87,1654.11 6394.16,1520.4 6394.16,1472.12 6397.67,1468.61 6460.12,1468.61 6500.84,1427.88 6500.84,1379.6
USB_VBUS: D6.1 R44.2 | length 116.2
  Top Layer w4: R44.2@6255,1425.47 6256.97,1425.47 6308.1,1476.61 6327.16,1476.61 6335,1484.45 D6.1@6335,1496.26
VREGOUT_NET: C38.1 IC3.8 IC3.25 IC3.31 IC3.44 IC3.66 | length 933.2
  Top Layer w4: C38.1@6187.95,2005 6188.7,2005.75 IC3.25@6244.49,2005.75 6275.34,2005.75 6275.45,2005.86 6291.57,2005.86 6300.86,1996.57 6300.86,1954.22 6263.71,1917.07 6263.09,1917.07 6257.28,1911.26 IC3.31@6244.49,1911.26 6299,1911.26 6311.88,1898.37 6365.27,1898.37 6409.94,1853.71 6409.94,1853.09 IC3.44@6415.75,1847.28 ; IC3.44@6415.75,1834.49 IC3.44@6415.75,1847.28 ; IC3.8@6415.75,2145.51 6417.69,2143.57 6417.69,2130.17 6463.37,2084.49 IC3.66@6555.51,2084.49 6553.57,2082.55 6540.17,2082.55 6501.92,2044.3 6501.92,1912.17 6467.54,1877.8 6445.65,1877.8 6421.56,1853.71 6421.56,1853.09 IC3.44@6415.75,1847.28
pads on no net: H11.3 H15.3 IC3.5 IC3.12 IC3.14 IC3.15 IC3.16 IC3.20 IC3.22 IC3.23 IC3.24 IC3.32 IC3.33 IC3.37 IC3.40 IC3.41 IC3.42 IC3.43 IC3.45 IC3.46 IC3.47 IC3.48 IC3.49 IC3.50 IC3.52 IC3.53 IC3.54 IC3.55 IC3.56 IC3.62 IC3.63 IC3.64 IC3.65 IC3.67 IC3.69 J3.4 J3.10 J3.11 U3.17 U3.18 U3.19 U3.20 U3.21 U3.22 U3.32 U6.15 U7.17 U7.18 U7.19 U7.20 U7.21 U7.22 U7.32 U8.6 U8.9 U9.6 U9.7 U9.9 U9.15 U10.1 U10.2 U10.3 U10.4 U10.11 U13.17 U13.18 U13.19 U13.20 U13.21 U13.22 U13.32

## Polygon pours and split planes (outlines as drawn)
GND on GND "GND_L02_P001" (solid, pour order 1): 1005,4995 6970,4995 7005,4960 6995,4950 6995,1010 1015,1010 1010,1015
3V3 on 3V3 "3V3_L03_P002" (solid, pour order 2): 1008.03,4991.97 1011.06,4995 6970,4995 6970,1031.97 6989.47,1012.5 1012.5,1012.5